# Altium PCB TYPEC_4KTransmitter-v1.0.PcbDoc (part 9 of 12)
Units mil, origin at the board's own origin, x right, y up, seen from the top; angles counter-clockwise.
Board outline 2834.7 x 1259.84 mil, 10 copper layers (Top Layer, GND-1, Signal L1, GND-2, PWR-1, PWR-2, GND-3, Signal L2, GND-4, Bottom Layer), stack 61.686 mil thick; 475 components, 338 nets, 2161 pads, 1240 vias.
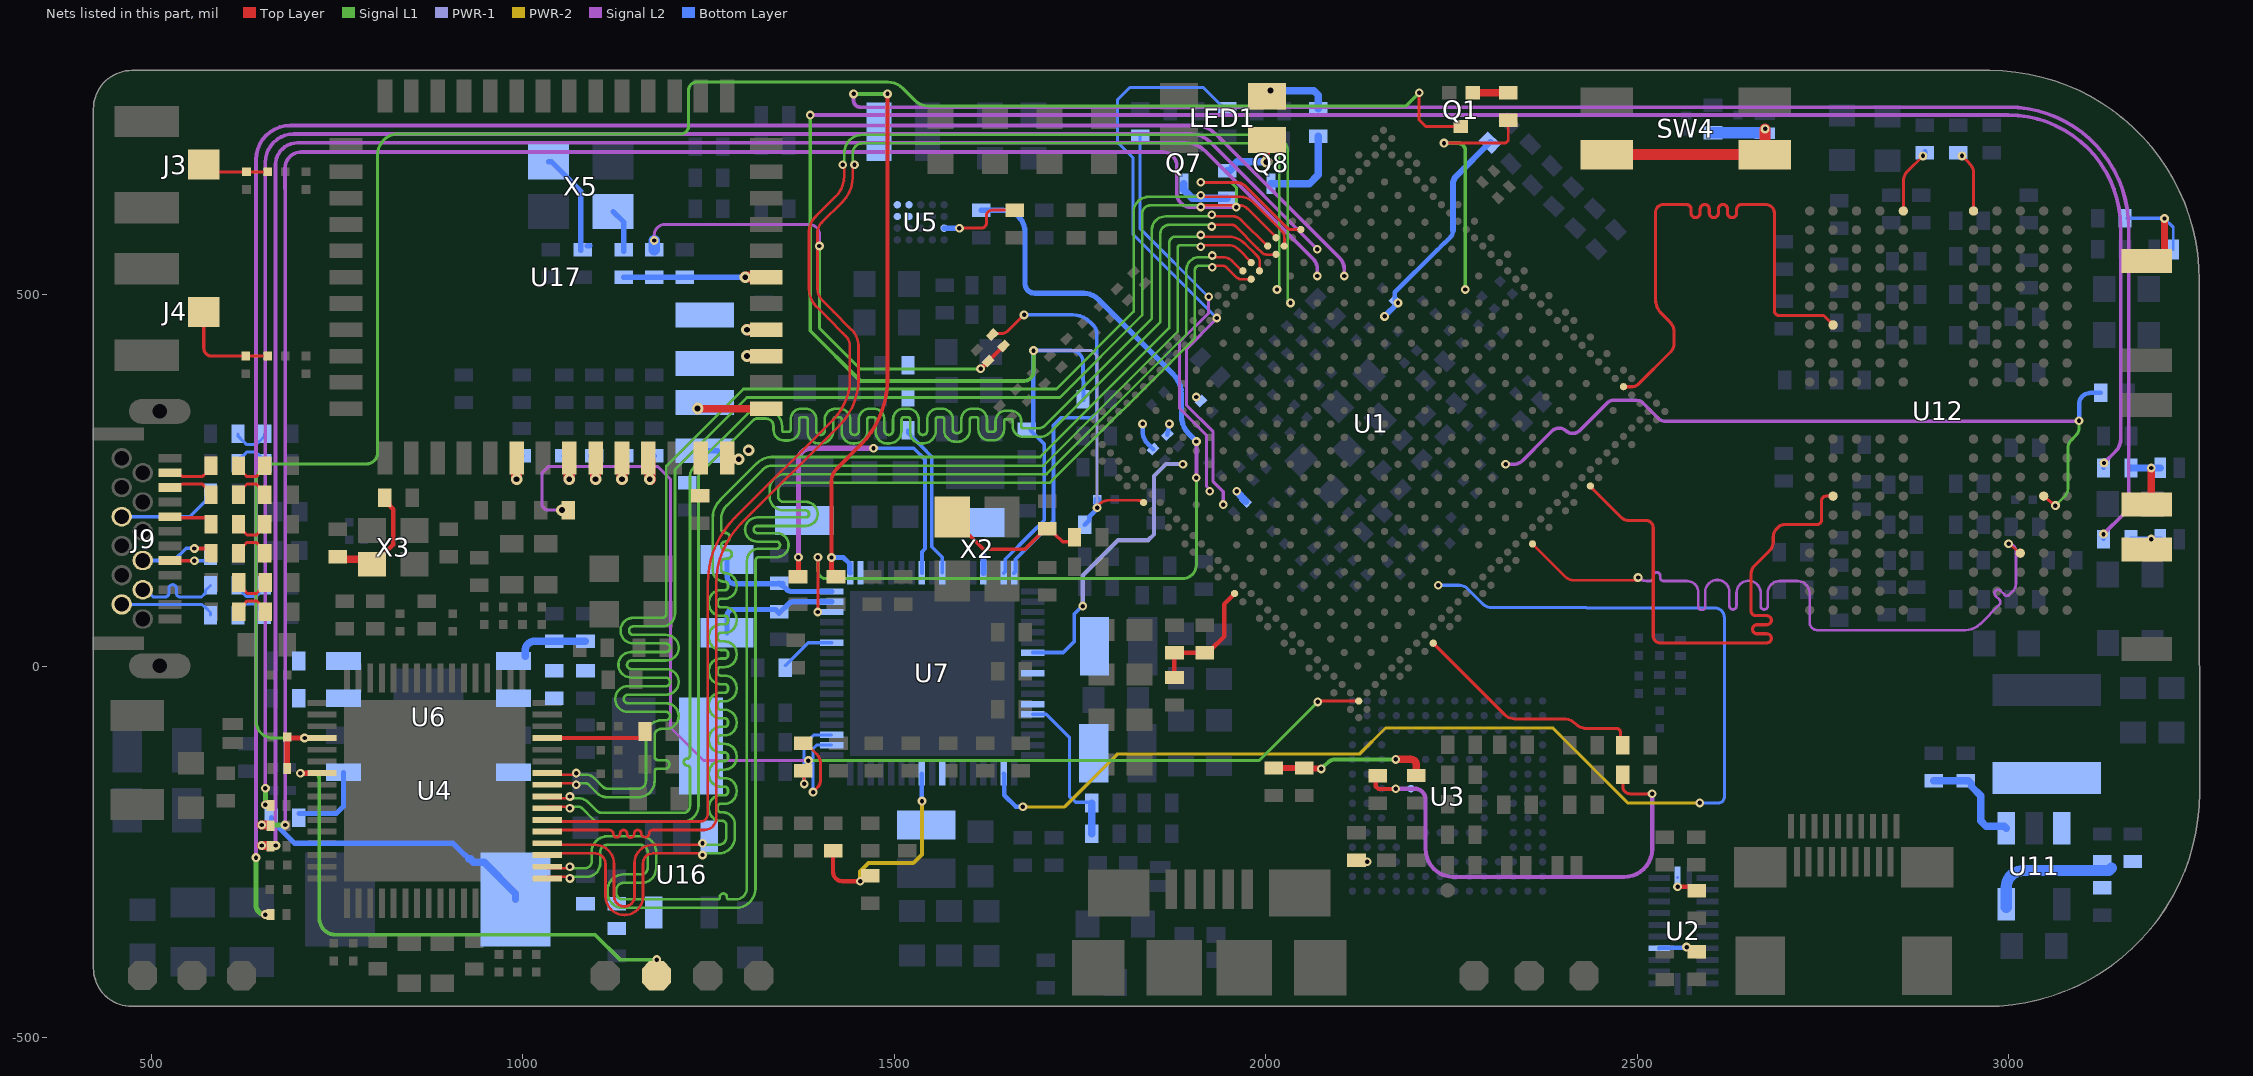
[diagram p15: the nets of this part, all layers, seen from the top]

## Via types
v1: diameter 11.81, hole 5.91, Top Layer to Bottom Layer, tented both sides, 710 vias
v2: diameter 15.75, hole 7.87, Top Layer to Bottom Layer, tented both sides, 265 vias
v3: diameter 11.81, hole 5.91, Top Layer to Signal L1, tented both sides, 146 vias
v4: diameter 11.81, hole 5.91, Signal L2 to Bottom Layer, 60 vias
v5: diameter 11.81, hole 5.91, Signal L1 to Signal L2, 38 vias
v6: diameter 11.81, hole 5.91, Top Layer to Signal L1, 16 vias
v7: diameter 11.81, hole 5.91, Top Layer to Bottom Layer, 4 vias
v8: diameter 11.81, hole 5.91, Signal L1 to Signal L2, tented both sides, 1 vias

## Nets (pads, with @x,y where several pads share a name; then routed paths per layer and width w, separated by ;. In a path a pad name is that pad's centre, name@x,y a point inside that pad or via, vN(x,y) a via of type N, cw(c..) or ccw(c..) an arc to the next point about the centre after c; other vN are vias at no path point) (continued)
LPDDR4_DQS1_B_P: U1.A17 U12.W10 | length 1057.4
  Top Layer w3.5: U1.A17@2359.19,164.36 2403.55,120 ccw(c2414.15,130.61) 2414.15,115.61 2497.86,115.61 ccw(c2497.86,119.11) v1(2501.36,119.11) ; v1(3000.07,164.69) U12.W10@3015.82,151.9
  Signal L2 w3.5: v1(2501.36,119.11) ccw(c2512.7,130.45) 2506.18,115.8 ccw(c2512.7,130.45) 2512.7,114.41 2516.91,114.41 ccw(c2516.91,119.16) 2521.66,119.16 2521.66,121.19 cw(c2526.41,121.19) 2531.16,121.19 2531.16,119.16 ccw(c2535.91,119.16) 2535.91,114.41 2567.19,114.41 cw(c2567.19,99.31) 2582.17,101.26 2582.29,97.78 2582.29,80.55 ; 2582.29,80.52 2582.29,80.27 ccw(c2587.04,80.27) 2591.79,80.27 2591.79,99.53 cw(c2608.04,99.53) 2624.29,99.53 2624.29,80.77 ccw(c2629.04,80.77) 2633.79,80.77 2633.79,98.4 cw(c2650.04,98.4) 2666.29,98.4 2666.29,80.77 ccw(c2671.04,80.77) 2675.79,80.77 2675.79,98.16 cw(c2692.04,98.16) 2692.04,114.41 2715.64,114.41 cw(c2715.64,97.85) 2732.2,97.85 2732.2,58.53 ccw(c2742.44,58.61) 2741.93,48.38 ccw(c2742.08,51.88) 2742.06,48.38 2748.37,48.38 2941.97,48.38 ccw(c2941.9,76.45) 2961.61,56.46 2961.95,56.8 ; 2961.97,56.82 2987.72,82.57 ccw(c2984.35,85.92) 2987.71,89.28 2982.56,94.43 cw(c2986.18,98) 2982.58,101.59 cw(c2985.71,98.46) 2988.83,101.6 2994.43,96 ccw(c2997.79,99.36) 3001.14,96 3005.81,100.66 3006.33,101.22 ccw(c2995.52,110.95) 3007.43,102.59 ccw(c2995.52,110.95) 3010.07,110.95 3010.07,154.69 ccw(c3000.07,154.69) v1(3000.07,164.69)
LPDDR4_ODT0_CA_A: U1.E2 U12.G2 | length 745.5
  Top Layer w4.2: U1.E2@2481.68,375.93 2493.52,375.93 ccw(c2493.52,387.38) 2501.61,379.28 ; 2501.61,379.29 2545.06,422.73 ccw(c2533.47,434.31) 2549.86,434.31 2549.86,448.58 ccw(c2528.25,448.58) 2543.53,463.86 2532.49,474.9 cw(c2550.91,493.32) 2524.86,493.32 2524.86,610.71 cw(c2535.28,610.71) 2535.28,621.13 2566.43,621.13 cw(c2566.43,614.98) 2569.94,620.03 cw(c2566.43,614.98) 2572.58,614.98 2572.58,609.69 ccw(c2578.73,609.69) 2584.88,609.69 2584.88,614.98 cw(c2591.03,614.98) 2597.18,614.98 2597.18,609.69 ccw(c2603.33,609.69) 2609.48,609.69 2609.48,614.98 cw(c2615.63,614.98) 2621.78,614.98 2621.78,609.69 ccw(c2627.93,609.69) 2634.08,609.69 2634.08,614.98 cw(c2640.23,614.98) 2640.23,621.13 2673.17,621.13 cw(c2673.17,609.44) 2684.86,609.44 2684.86,478.17 ccw(c2691.33,478.17) 2691.33,471.69 2751.14,471.69 U12.G2@2763.85,458.99
LPDDR4_ODT0_CA_B: U1.A10 U12.T2 | length 760
  Top Layer w4.2: U1.A10@2437.14,242.31 2437.14,241.55 2478.35,200.33 ccw(c2488.96,210.94) 2488.96,195.94 2511.88,195.94 cw(c2511.88,186.12) 2521.7,186.12 2521.7,40.46 ccw(c2531.03,40.46) 2531.03,31.13 2674.69,31.13 ccw(c2674.69,36.97) 2678.82,32.84 ; 2674.61,31.15 ccw(c2674.61,37.25) 2674.61,43.35 2661.47,43.35 cw(c2661.47,49.45) 2661.47,55.55 2674.61,55.55 ccw(c2674.61,61.65) 2674.61,67.75 2659.63,67.75 cw(c2659.63,73.85) 2653.53,73.85 2653.53,124.14 cw(c2669.04,124.14) 2658.1,135.13 2678.86,155.88 ; 2678.86,155.89 ccw(c2668.31,166.43) 2683.23,166.43 2683.23,174.11 cw(c2697.3,174.11) 2687.34,184.05 ; 2687.35,184.06 2690.64,187.36 cw(c2697.78,180.26) 2697.78,190.33 2741.87,190.33 ccw(c2741.87,196.87) 2748.41,196.87 2748.41,222.66 cw(c2754.41,222.66) 2754.41,228.66 U12.T2@2763.85,228.67
LPDDR4_RESETn: C238.2 U1.1C7 U12.T11 | length 1040.1
  Top Layer w4.1: U12.T11@3047.31,228.67 v1(3063.06,215.87)
  Signal L1 w4: v1(3063.06,215.87) 3075.47,228.28 ccw(c3064.86,238.88) 3079.86,238.88 3079.86,293.28 cw(c3094.86,293.28) 3084.24,303.88 3090.47,310.11 ccw(c3079.86,320.71) 3094.86,320.71 v1(3094.86,330.03)
  Signal L2 w4.7: v1(2322.99,271.54) 2333.77,271.54 ccw(c2333.77,288.93) 2346.05,276.62 ; 2346.06,276.63 2377.79,308.36 ; 2377.81,308.39 2386.01,316.56 cw(c2394.98,307.57) 2388.82,318.68 cw(c2394.98,307.57) 2401.78,318.3 cw(c2394.98,307.57) 2401.96,318.19 2404.51,316.51 ; 2417.68,313.84 cw(c2413.47,325.83) 2406.5,315.21 2404.51,316.51 ; 2422.18,316.34 cw(c2413.44,325.82) 2404.51,316.51 ; 2422.2,316.36 2459.88,354.03 cw(c2468.31,345.6) 2468.31,357.53 2498.64,357.53 cw(c2498.64,343.77) 2508.37,353.5 2528.28,333.59 ccw(c2538.57,343.88) 2528.35,333.52 ccw(c2538.57,343.88) 2538.57,329.33 v1@3094.86,329.33
  Bottom Layer w6: v1(3094.86,330.03) 3094.86,352.26 cw(c3109.86,352.26) 3099.25,362.86 3099.52,363.13 cw(c3110.13,352.53) 3110.13,367.53 C238.2@3123.86,367.53
MIPI_CSI_RX_CLK0_N: U1.1U9 U4.54 | length 2055.8
  Top Layer w3.5: U4.54@1033.07,-207.15 ccw(c1035.2,-207.15) 1035.2,-209.27 1239.49,-209.27 ccw(c1239.49,-199.63) 1249.13,-199.63 1249.13,111 cw(c1374.94,110.77) 1286.07,199.83 1418.2,331.95 ccw(c1364.2,385.96) 1440.57,386.1 ; 1385.42,507.82 ccw(c1418.94,507.72) 1395.25,484 ; 1385.42,507.86 1385.42,584.45 cw(c1400.42,584.38) 1385.43,584.9 cw(c1391.17,584.76) 1385.43,585.03 cw(c1415.57,583.53) 1393.17,603.75 cw(c1397.45,599.9) 1393.29,603.87 cw(c1404.25,593.64) 1393.59,604.19 1395.06,605.66 ; 1395.08,605.68 1421.69,632.29 ccw(c1394.54,659.49) 1432.97,659.49 1432.97,659.54 1432.97,674.73 v3(1430.82,674.73) ; 1395.28,483.97 1410.9,468.35 ; 1410.92,468.33 1431.45,447.8 ccw(c1439.59,455.93) 1431.49,447.76 1434.84,444.41 cw(c1421.11,430.62) 1440.57,430.62 1440.57,386.11
  Signal L1 w3.5: v3(1430.82,674.73) 1432.97,674.73 1432.97,690.67 cw(c1457.2,690.67) 1457.2,714.9 2006.54,714.9 cw(c2006.54,691.41) 2030.03,691.41 2030.03,488.68 v1(2033.47,488.68)
MIPI_CSI_RX_CLK0_P: U1.1V9 U4.53 | length 2055.9
  Top Layer w3.5: U4.53@1033.07,-222.9 cw(c1035.2,-222.9) 1035.2,-220.77 1116.85,-220.77 cw(c1116.85,-226.15) 1122.22,-226.15 ccw(c1126.66,-226.17) 1131.1,-226.17 1131.1,-225.52 cw(c1135.85,-225.52) 1140.6,-225.52 1140.6,-226.11 ccw(c1145.35,-226.11) 1150.1,-226.11 1150.1,-225.52 cw(c1154.85,-225.52) 1159.6,-225.52 ccw(c1164.38,-225.52) 1164.38,-230.3 1165.61,-230.3 ccw(c1165.61,-225.64) 1165.93,-230.29 ccw(c1165.61,-225.64) 1170.26,-225.65 cw(c1175.13,-225.65) 1175.13,-220.77 1244.25,-220.77 ccw(c1244.25,-204.4) 1260.63,-204.4 1260.63,110.98 cw(c1374.94,110.77) 1294.23,191.72 1426.33,323.82 ccw(c1364.2,385.96) 1452.07,386.13 1452.07,430.62 ccw(c1421.11,430.62) 1442.97,452.55 1439.59,455.93 1419.05,476.46 ; 1396.92,507.79 ccw(c1418.94,507.72) 1403.37,492.14 ; 1396.92,507.86 1396.92,584.4 cw(c1400.42,584.38) 1396.92,584.54 cw(c1415.57,583.53) 1401.67,596 ; 1401.67,596.01 cw(c1404.25,593.64) 1401.75,596.09 1403.19,597.53 ; 1403.21,597.55 1430.42,624.75 ccw(c1396.5,658.68) 1444.47,658.68 1444.47,658.73 1444.47,674.73 v3(1446.63,674.73) ; 1403.41,492.1 1419.02,476.5 ; 1419.05,476.46 ccw(c1410.92,468.33) 1419.02,476.5
  Signal L1 w3.5: v3(1446.63,674.73) 1444.47,674.73 1444.47,690.67 cw(c1457.2,690.67) 1457.2,703.4 2006.54,703.4 cw(c2006.54,691.41) 2018.53,691.41 2018.53,506.78 v1(2015.37,506.78)
MIPI_CSI_RX_D0_N: U1.AR18 U4.50 | length 2052.6
  Top Layer w3.5: U4.50@1033.07,-270.14 ccw(c1035.2,-270.14) 1035.2,-272.26 1061.44,-272.26 ccw(c1061.44,-270.11) v3(1063.6,-270.11) ; v3(1928.36,552.54) 1928.36,550.38 1942.35,550.38 1942.42,550.38 cw(c1942.41,532.62) 1954.97,545.18 1955.03,545.12 1968.32,531.83 U1.AR18@1969.44,531.83
  Signal L1 w3.5: v3(1063.6,-270.11) 1063.6,-272.26 1079.14,-272.26 1083.77,-272.26 ccw(c1083.77,-263.05) 1092.98,-263.05 1092.98,-250.07 cw(c1113.79,-250.07) 1113.79,-229.27 1158.81,-229.27 cw(c1158.81,-250.2) 1179.74,-250.2 1179.74,-272.13 cw(c1159.89,-272.13) 1159.89,-291.99 1135.57,-291.99 ccw(c1135.57,-301.47) 1126.09,-301.47 1126.09,-305.55 ccw(c1134.57,-305.55) 1134.57,-314.04 1262.9,-314.04 ccw(c1262.9,-311.5) 1265.44,-311.5 ; 1265.44,-311 cw(c1270.19,-311) 1274.94,-311 1274.94,-311.5 ccw(c1277.48,-311.5) 1277.48,-314.04 1286.98,-314.04 ccw(c1286.98,-299.11) 1301.91,-299.12 1301.91,-299.04 1301.91,141.7 cw(c1318.16,141.7) 1318.16,157.95 1341.7,157.95 ccw(c1341.7,162.7) 1341.7,167.45 1315.59,167.45 cw(c1315.63,183.7) 1315.64,199.95 1380.88,199.95 ccw(c1380.88,204.7) 1380.88,209.45 1351.05,209.45 cw(c1351.05,228.02) 1332.48,228.02 1332.48,237.19 cw(c1353.51,237.19) 1353.51,258.22 1705.07,258.22 1893.37,446.53 1893.37,532.96 cw(c1910.8,532.96) 1910.8,550.38 1928.36,550.38 v3(1928.36,552.54)
MIPI_CSI_RX_D0_P: U1.AP18 U4.49 | length 2052.8
  Top Layer w3.5: U4.49@1033.07,-285.89 cw(c1035.2,-285.89) 1035.2,-283.76 1061.44,-283.76 cw(c1061.44,-285.92) v3(1063.6,-285.92) ; v3@1930.14,538.88 1940.94,538.88 cw(c1940.94,529.06) 1947.88,536 1949.22,534.67 1960.71,523.18 1961.29,522.73 ccw(c1968.32,531.83) 1968.32,520.33 1971.88,520.33 1980.21,520.33 U1.AP18@1980.58,520.7
  Signal L1 w3.5: v3(1063.6,-285.92) 1063.6,-283.76 1086.11,-283.76 ccw(c1086.11,-265.39) 1104.48,-265.39 1104.48,-250.13 cw(c1113.96,-250.25) 1113.96,-240.77 1158.81,-240.77 cw(c1158.81,-250.2) 1168.24,-250.2 1168.24,-272.13 cw(c1159.89,-272.13) 1159.89,-280.49 1135.57,-280.49 ccw(c1135.57,-301.47) 1114.59,-301.47 1114.59,-305.55 ccw(c1134.57,-305.55) 1134.57,-325.54 1286.98,-325.54 ccw(c1286.98,-299.11) 1313.41,-299.13 1313.41,-299.06 ; 1313.41,-299.04 1313.41,141.7 cw(c1318.16,141.7) 1318.16,146.45 1341.7,146.45 ccw(c1341.7,162.7) 1341.7,178.95 1315.62,178.95 cw(c1315.63,183.7) 1315.63,188.45 1380.88,188.45 ccw(c1380.88,204.7) 1380.88,220.95 1351.19,220.95 cw(c1351.19,228.17) 1343.98,228.17 1343.98,237.19 cw(c1353.51,237.19) 1353.51,246.72 1709.83,246.72 1904.87,441.76 1904.87,532.95 cw(c1910.8,532.95) 1910.8,538.88 1928.36,538.88 v3(1928.36,536.73)
MIPI_CSI_RX_D1_N: U1.AP17 U4.52 | length 2055.9
  Top Layer w3.5: U4.52@1033.07,-238.65 ccw(c1035.19,-238.65) 1035.19,-240.77 1097.45,-240.77 cw(c1097.45,-266.36) 1123.04,-266.36 1123.04,-309.55 ccw(c1137.14,-309.55) 1137.14,-323.65 ccw(c1137.14,-310.26) 1150.53,-310.26 1150.53,-298.42 ; 1150.53,-298.36 1150.53,-265.37 cw(c1175.13,-265.37) 1175.13,-240.77 1239.95,-240.77 ccw(c1239.95,-238.61) v3(1242.1,-238.61) ; v3(1912.78,580.13) 1912.78,577.98 1949.25,577.98 cw(c1949.25,545.24) 1972.4,568.39 1972.44,568.34 1986.46,554.32 1988.3,552.49 1988.73,552.05 cw(c1980.58,543.94) 1992.08,543.94 1992.08,542.97 1992.08,538.88 1992.08,532.2 U1.AP17@1991.71,531.83
  Signal L1 w3.5: v3(1242.1,-238.61) ccw(c1244.26,-238.61) 1244.26,-240.77 1263.9,-240.77 ccw(c1263.9,-230.5) 1274.17,-230.54 ; 1271.85,113.59 cw(c1271.85,129.69) 1255.75,129.69 1255.75,198.35 cw(c1291.62,198.42) 1266.28,223.81 1315.4,272.93 cw(c1335.47,252.91) 1334.68,281.24 cw(c1335.47,252.91) 1335.56,281.26 1381.73,281.26 1696.64,281.26 1870.27,454.88 1870.27,568.98 cw(c1879.27,568.98) 1879.27,577.98 1912.78,577.98 v3(1912.78,580.13) ; 1271.87,113.59 cw(c1271.87,108.99) 1276.47,108.99 1276.47,106.69 cw(c1271.87,106.69) 1271.87,102.09 1266.85,102.09 ccw(c1266.85,85.99) 1250.75,85.99 1250.75,83.69 ccw(c1266.85,83.69) 1266.85,67.59 1271.87,67.59 cw(c1271.87,62.99) 1276.47,62.99 1276.47,60.69 cw(c1271.87,60.69) 1271.87,56.09 1266.85,56.09 ccw(c1266.85,39.99) 1250.75,39.99 1250.75,37.69 ccw(c1266.85,37.69) 1266.85,21.59 1271.87,21.59 cw(c1271.87,16.99) 1276.47,16.99 1276.47,14.69 cw(c1271.87,14.69) 1271.87,10.09 1266.85,10.09 ccw(c1266.85,-6.01) 1250.75,-6.01 1250.75,-8.31 ccw(c1266.85,-8.31) 1266.85,-24.41 1271.87,-24.41 cw(c1271.87,-29.01) 1276.47,-29.01 1276.47,-31.31 cw(c1271.87,-31.31) 1271.87,-35.91 1266.85,-35.91 ccw(c1266.85,-52.01) 1250.75,-52.01 1250.75,-54.31 ccw(c1266.85,-54.31) 1266.85,-70.41 1271.87,-70.41 cw(c1271.87,-75.01) 1276.47,-75.01 1276.47,-77.31 cw(c1271.87,-77.31) 1271.87,-81.91 1266.85,-81.91 ccw(c1266.85,-98.01) 1250.75,-98.01 1250.75,-100.31 ccw(c1266.85,-100.31) 1266.85,-116.41 1271.87,-116.41 cw(c1271.87,-121.01) 1276.47,-121.01 1276.47,-123.31 cw(c1271.87,-123.31) 1271.87,-127.91 1266.85,-127.91 ccw(c1266.85,-144.01) 1250.75,-144.01 1250.75,-146.31 ccw(c1266.85,-146.31) 1266.85,-162.41 1271.87,-162.41 cw(c1271.87,-167.01) 1276.47,-167.01 1276.47,-169.31 cw(c1271.87,-169.31) 1271.87,-173.91 1266.85,-173.91 ccw(c1266.85,-190.01) 1250.75,-190.01 1250.75,-192.31 ccw(c1266.85,-192.31) 1264.44,-208.23 ccw(c1266.85,-192.31) 1266.85,-208.41 1268.56,-208.41 cw(c1268.56,-213.97) 1274.12,-213.97 1274.12,-220.44 ; 1274.15,-230.52 1274.15,-220.46
MIPI_CSI_RX_D1_P: U1.AR17 U4.51 | length 2056
  Top Layer w3.5: U4.51@1033.07,-254.39 cw(c1035.19,-254.39) 1035.19,-252.27 1097.45,-252.27 cw(c1097.45,-266.36) 1111.54,-266.36 1111.54,-309.55 ccw(c1137.14,-309.55) 1137.14,-335.15 ccw(c1137.14,-310.26) 1162.03,-310.26 1162.03,-265.37 cw(c1175.13,-265.37) 1175.13,-252.27 1239.95,-252.27 cw(c1239.95,-254.42) v3(1242.1,-254.42) ; v3(1912.78,564.32) 1912.78,566.48 1948.82,566.48 cw(c1948.82,544.2) 1964.57,559.95 1980.58,543.94 U1.AR17@1980.58,542.97
  Signal L1 w3.5: v3(1242.1,-254.42) cw(c1244.26,-254.42) 1244.26,-252.27 1263.9,-252.27 ccw(c1263.9,-230.5) 1285.67,-230.54 1285.67,-225.78 ; 1267.25,198.35 1267.25,184.83 ccw(c1273,184.83) 1273,179.08 cw(c1273.01,173.33) 1273.01,167.58 ccw(c1273,161.83) 1273,156.08 1275.84,156.08 cw(c1275.84,150.33) 1275.84,144.58 1273,144.58 ccw(c1273,138.83) 1267.25,138.83 1267.25,129.7 ccw(c1271.87,129.7) 1271.87,125.09 cw(c1271.87,108.99) 1287.97,108.99 1287.97,106.69 cw(c1271.87,106.69) 1271.87,90.59 1266.85,90.59 ccw(c1266.85,85.99) 1262.25,85.99 1262.25,83.69 ccw(c1266.85,83.69) 1266.85,79.09 1271.87,79.09 cw(c1271.87,62.99) 1287.97,62.99 1287.97,60.69 cw(c1271.87,60.69) 1271.87,44.59 1266.85,44.59 ccw(c1266.85,39.99) 1262.25,39.99 1262.25,37.69 ccw(c1266.85,37.69) 1266.85,33.09 1271.87,33.09 cw(c1271.87,16.99) 1287.97,16.99 1287.97,14.69 cw(c1271.87,14.69) 1271.87,-1.41 1266.85,-1.41 ccw(c1266.85,-6.01) 1262.25,-6.01 1262.25,-8.31 ccw(c1266.85,-8.31) 1266.85,-12.91 1271.87,-12.91 cw(c1271.87,-29.01) 1287.97,-29.01 1287.97,-31.31 cw(c1271.87,-31.31) 1271.87,-47.41 1266.85,-47.41 ccw(c1266.85,-52.01) 1262.25,-52.01 1262.25,-54.31 ccw(c1266.85,-54.31) 1266.85,-58.91 1271.87,-58.91 cw(c1271.87,-75.01) 1287.97,-75.01 1287.97,-77.31 cw(c1271.87,-77.31) 1271.87,-93.41 1266.85,-93.41 ccw(c1266.85,-98.01) 1262.25,-98.01 1262.25,-100.31 ccw(c1266.85,-100.31) 1266.85,-104.91 1271.87,-104.91 cw(c1271.87,-121.01) 1287.97,-121.01 1287.97,-123.31 cw(c1271.87,-123.31) 1271.87,-139.41 1266.85,-139.41 ccw(c1266.85,-144.01) 1262.25,-144.01 1262.25,-146.31 ccw(c1266.85,-146.31) 1266.85,-150.91 1271.87,-150.91 cw(c1271.87,-167.01) 1287.97,-167.01 1287.97,-169.31 cw(c1271.87,-169.31) 1271.87,-185.41 1266.85,-185.41 ccw(c1266.85,-190.01) 1262.25,-190.01 1262.25,-192.31 ccw(c1266.85,-192.31) 1266.85,-196.91 1269.1,-196.91 cw(c1269.1,-213.44) 1285.62,-213.44 1285.65,-225.76 ; 1267.25,198.39 cw(c1291.62,198.42) 1274.38,215.64 ; 1274.41,215.67 1323.46,264.72 cw(c1335.59,252.62) 1335.59,269.76 1701.41,269.76 1881.77,450.12 1881.77,562.87 cw(c1885.37,562.87) 1885.37,566.48 1911,566.48 v3@1912.02,565.45 ; v3@1912.02,565.45 1912.78,564.7 v3(1912.78,564.32)
MIPI_CSI_RX_D2_N: U1.AR15 U4.56 | length 2055.7
  Top Layer w3.5: U4.56@1033.07,-175.65 ccw(c1035.2,-175.65) 1035.2,-177.77 1061.44,-177.77 ccw(c1061.44,-175.62) v3(1063.6,-175.62) ; v3(1927.46,607.32) 1927.46,605.17 1956.05,605.17 cw(c1956.05,589.62) 1967.04,600.62 1967.09,600.57 U1.AR15@2002.42,565.24
  Signal L1 w3.5: v3(1063.6,-175.62) 1063.6,-177.77 1074.83,-177.77 1074.89,-177.77 cw(c1074.89,-196.28) 1087.98,-183.2 1088.04,-183.26 1099.19,-194.41 ccw(c1107.32,-186.27) 1107.32,-197.77 1215.64,-197.77 ccw(c1215.64,-188.16) 1225.25,-188.16 1225.25,-137.81 ccw(c1221.49,-137.81) 1221.49,-134.05 cw(c1221.49,-129.3) 1221.49,-124.55 ccw(c1221.49,-120.79) 1225.25,-120.79 1225.25,255.66 cw(c1240.25,255.66) 1229.61,266.24 1302.59,339.21 ; 1302.61,339.23 cw(c1315.63,326.32) 1315.63,344.66 1327.25,344.66 cw(c1327.26,329.66) 1327.34,344.66 cw(c1327.33,338.91) 1327.4,344.66 cw(c1327.13,322.61) 1349.18,322.61 1349.18,317.93 ccw(c1352.06,317.93) 1352.06,315.06 1357.81,315.06 ccw(c1357.81,317.93) 1360.68,317.93 1360.68,331.85 cw(c1375.06,331.85) 1375.06,346.22 1380.81,346.22 cw(c1380.81,331.85) 1395.18,331.85 1395.18,316.71 ccw(c1400.94,316.71) 1400.93,310.95 ccw(c1400.92,316.71) 1406.68,316.71 1406.68,331.85 cw(c1421.06,331.85) 1420.88,346.22 ; 1421.06,346.22 ccw(c1421.06,331.85) 1420.88,346.22 ; 1579,332.17 cw(c1567.5,331.94) 1579,332.1 cw(c1564.01,331.81) 1579.01,331.81 1579.01,318.2 ccw(c1583.72,318.2) 1583.72,313.48 1585.76,313.48 ccw(c1585.76,318.23) 1590.51,318.23 1590.51,331.85 cw(c1604.88,331.85) 1604.88,346.22 1610.63,346.22 cw(c1610.63,331.85) 1625.01,331.85 1625.01,318.13 ccw(c1627.88,318.13) 1627.88,315.26 1633.63,315.26 ccw(c1633.63,318.13) 1636.51,318.13 1636.51,329.43 cw(c1650.88,329.43) 1650.88,343.8 1656.63,343.8 cw(c1656.63,329.43) 1671.01,329.43 1671.01,322.86 ccw(c1673.88,322.86) 1673.88,319.99 1693.2,319.99 1694.61,319.99 ccw(c1694.61,331.27) 1702.59,323.29 1846.88,467.58 1846.88,586.69 cw(c1865.36,586.69) 1865.36,605.17 1927.46,605.17 v3(1927.46,607.32) ; 1579,332.22 ccw(c1564.63,331.85) 1579,332.32 ccw(c1564.63,331.85) 1564.63,346.22 1558.88,346.22 ccw(c1558.88,331.85) 1544.51,331.85 1544.51,316.71 cw(c1538.75,316.71) 1538.76,310.95 cw(c1538.77,316.71) 1533.01,316.71 1533.01,331.85 ccw(c1518.63,331.85) 1518.63,346.22 1512.88,346.22 ccw(c1512.88,331.85) 1498.51,331.85 1498.51,316.71 cw(c1492.75,316.71) 1492.76,310.95 cw(c1492.77,316.71) 1487.01,316.71 1487.01,331.85 ccw(c1472.63,331.85) 1472.63,346.22 1466.88,346.22 ccw(c1466.88,331.85) 1452.51,331.85 1452.51,316.71 cw(c1446.75,316.71) 1446.76,310.95 cw(c1446.77,316.71) 1441.01,316.71 1441.01,331.85 ccw(c1426.63,331.85) 1426.63,346.22 1420.88,346.22
MIPI_CSI_RX_D2_P: U1.AP15 U4.55 | length 2055.8
  Top Layer w3.5: U4.55@1033.07,-191.4 cw(c1035.2,-191.4) 1035.2,-189.27 1061.44,-189.27 cw(c1061.44,-191.43) v3(1063.6,-191.43) ; v3@1929.24,593.67 1955.48,593.67 cw(c1955.48,588.26) 1959.31,592.09 1989.33,562.07 1994.29,557.11 ccw(c2002.42,565.24) 2000.06,553.98 2001.21,553.74 2013.62,553.74 U1.AP15@2013.99,554.1
  Signal L1 w3.5: v3(1063.6,-191.43) 1063.6,-191.06 1065.38,-189.27 1074.85,-189.27 cw(c1074.85,-196.38) 1079.87,-191.36 1094.78,-206.26 ccw(c1102.05,-198.99) 1102.05,-209.27 1215.64,-209.27 ccw(c1215.64,-188.16) 1236.75,-188.16 1236.75,255.66 cw(c1240.25,255.66) 1237.76,258.12 1310.62,330.98 cw(c1315.88,325.72) 1315.88,333.16 1327.25,333.16 ; 1327.29,333.16 cw(c1327.13,322.61) 1337.68,322.61 1337.68,317.9 ccw(c1352.06,317.93) 1352.06,303.56 1357.81,303.56 ccw(c1357.81,317.93) 1372.18,317.93 1372.18,331.85 cw(c1375.06,331.85) 1375.06,334.72 1380.81,334.72 cw(c1380.81,331.85) 1383.68,331.85 1383.68,314.45 ccw(c1398.68,314.45) 1398.68,299.45 1400.92,299.45 ccw(c1400.92,316.71) 1418.18,316.71 1418.18,331.85 cw(c1421.06,331.85) 1420.98,334.72 1426.63,334.72 cw(c1426.63,331.85) 1429.51,331.85 1429.51,331.29 ccw(c1444.51,331.29) 1429.53,330.52 1429.67,327.76 cw(c1418.18,327.16) 1429.68,327.16 1429.68,314.45 ccw(c1444.68,314.45) 1444.68,299.45 1446.75,299.45 ccw(c1446.75,316.71) 1464.01,316.71 1464.01,331.85 cw(c1466.88,331.85) 1466.88,334.72 1472.63,334.72 cw(c1472.63,331.85) 1475.51,331.85 1475.51,314.45 ccw(c1490.51,314.45) 1490.51,299.45 1492.75,299.45 ccw(c1492.75,316.71) 1510.01,316.71 1510.01,331.85 cw(c1512.88,331.85) 1512.88,334.72 1518.63,334.72 cw(c1518.63,331.85) 1521.51,331.85 1521.51,314.45 ccw(c1536.51,314.45) 1536.51,299.45 1538.75,299.45 ccw(c1538.75,316.71) 1556.01,316.71 1556.01,331.85 cw(c1558.88,331.85) 1558.88,334.72 1564.63,334.72 cw(c1564.63,331.85) 1567.5,331.94 cw(c1564.01,331.81) 1567.51,331.81 1567.51,316.98 ccw(c1582.51,316.98) 1582.51,301.98 1585.76,301.98 ccw(c1585.76,318.23) 1602.01,318.23 1602.01,331.85 cw(c1604.88,331.85) 1604.88,334.72 1610.63,334.72 cw(c1610.63,331.85) 1613.51,331.85 1613.51,318.13 ccw(c1627.88,318.13) 1627.88,303.76 1633.63,303.76 ccw(c1633.63,318.13) 1648.01,318.13 1648.01,329.43 cw(c1650.88,329.43) 1650.88,332.3 1656.63,332.3 cw(c1656.63,329.43) 1659.51,329.43 1659.51,322.86 ccw(c1673.88,322.86) 1673.88,308.49 1696.22,308.49 ccw(c1696.3,327.2) 1709.55,313.98 1858.38,462.82 1858.38,581.92 cw(c1870.13,581.92) 1870.13,593.67 1927.46,593.67 v3(1927.46,591.51)
MIPI_CSI_RX_D3_N: U1.AP14 U4.58 | length 2055.9
  Top Layer w3.5: U4.58@1033.07,-144.16 ccw(c1035.2,-144.16) 1035.2,-146.28 1069.95,-146.28 ccw(c1069.95,-144.13) v3(1072.1,-144.13) ; v3(1912.78,633.64) 1912.78,631.48 1966.36,631.48 1966.42,631.48 cw(c1966.41,608.28) 1982.82,624.68 1982.89,624.62 2018.53,588.97 2019.68,587.83 2022.14,585.37 cw(c2013.99,577.26) 2025.21,579.75 cw(c2021.79,579.01) 2025.29,579.14 2025.49,573.81 2025.49,565.6 U1.AP14@2025.12,565.24
  Signal L1 w3.5: v3(1072.1,-144.13) 1072.1,-146.28 1085.08,-146.28 1085.15,-146.28 cw(c1085.13,-162.49) 1096.59,-151.03 1096.64,-151.08 1108.33,-162.77 ccw(c1113.96,-157.14) 1113.96,-165.1 1155.8,-165.1 ccw(c1155.8,-154.79) 1166.11,-154.79 1166.11,-93.66 cw(c1186.63,-93.66) 1186.63,-73.14 1192.81,-73.14 ccw(c1192.81,-67.39) 1192.81,-61.64 1141.86,-61.64 cw(c1141.86,-44.39) 1141.86,-27.14 1192.81,-27.14 ccw(c1192.81,-21.39) 1192.81,-15.64 1146.17,-15.64 cw(c1146.17,1.61) 1146.17,18.86 1192.81,18.86 ccw(c1192.81,24.61) 1192.81,30.36 1149.04,30.36 cw(c1149.04,47.61) 1149.04,64.86 1187.81,64.86 ccw(c1187.81,70.61) 1193.56,70.61 1193.56,269.28 1297.11,372.84 1718.29,372.84 1822.5,477.04 1822.5,611.2 cw(c1842.78,611.2) 1842.78,631.48 1912.78,631.48 v3(1912.78,633.64)
MIPI_CSI_RX_D3_P: U1.AR14 U4.57 | length 2055.8
  Top Layer w3.5: U4.57@1033.07,-159.91 cw(c1035.2,-159.91) 1035.2,-157.78 1069.95,-157.78 cw(c1069.95,-159.94) v3(1072.1,-159.94) ; v3(1912.78,617.82) 1912.78,619.98 1965.16,619.98 cw(c1965.16,605.26) 1975.57,615.67 2013.99,577.26 U1.AR14@2013.99,576.37
  Signal L1 w3.5: v3(1072.1,-159.94) 1072.1,-159.57 1073.88,-157.78 1083.65,-157.78 cw(c1083.65,-166.06) 1089.48,-160.18 1091.15,-161.85 1100.3,-171 ccw(c1113.74,-157.67) 1113.74,-176.6 1113.79,-176.6 1155.8,-176.6 ccw(c1155.8,-154.79) 1176.94,-160.15 ccw(c1155.8,-154.79) 1177.3,-158.4 ccw(c1155.8,-154.79) 1177.61,-154.79 1177.61,-141.77 cw(c1181.11,-141.79) 1180.79,-138.31 cw(c1181.49,-146.28) 1181.49,-138.28 1191.95,-138.28 ccw(c1191.95,-132.53) 1192.03,-126.78 1182.86,-126.78 cw(c1182.86,-121.53) 1177.61,-121.53 1177.61,-93.66 cw(c1186.63,-93.66) 1186.63,-84.64 1192.81,-84.64 ccw(c1192.81,-67.39) 1192.81,-50.14 1141.86,-50.14 cw(c1141.86,-44.39) 1141.86,-38.64 1192.81,-38.64 ccw(c1192.81,-21.39) 1192.81,-4.14 1146.17,-4.14 cw(c1146.17,1.61) 1146.17,7.36 1192.81,7.36 ccw(c1192.81,24.61) 1192.81,41.86 1149.04,41.86 cw(c1149.04,47.61) 1149.04,53.36 1187.81,53.36 ccw(c1187.81,70.61) 1205.06,70.61 1205.06,264.52 1301.88,361.34 1723.06,361.34 1834,472.28 1834,608.96 cw(c1845.02,608.96) 1845.02,619.98 1912.78,619.98 v3(1912.78,617.82)
NetC5_2: C5.2 L1.1 U17.25 | length 35.5
  Bottom Layer w7: L1.1@1245.36,289.76 1262.18,289.76 L1.1@1275.41,276.53
  other v2: 1290.99,278.37 1304.17,290.41
NetC6_2: C6.2 C184.2 J3.1 | length 74.6
  Top Layer w4.2: J3.1@582.36,665.16 629.29,665.16 C6.2@656.98,665.16
NetC7_2: C7.2 C185.2 J4.1 | length 140.9
  Top Layer w4.2: J4.1@570.88,476.5 570.88,427.84 ccw(c581.59,427.84) 581.59,417.13 629.29,417.13 C7.2@656.98,417.13
NetC10_1: C10.1 U6.1 | length 109.3
  Bottom Layer w7: C10.1@699.05,-198.49 749.13,-198.49 758.85,-188.77 U6.1@758.85,-143.28
NetC10_2: C10.2 L12.1 U6.8 | length 381.3
  Bottom Layer w7: C10.2@661.81,-203.99 661.81,-207.49 692.93,-238.62 906.39,-238.62 922.56,-254.78 923.14,-254.78 927.37,-259.02 927.37,-259.6
  Bottom Layer w10: 927.37,-259.6 929.52,-259.6 934.03,-264.11 948.17,-264.11 990.42,-306.35 L12.1@990.42,-314.28
NetC11_1: C11.1 R4.2
NetC31_1: C31.1 U7.46 | length 75.1
  Bottom Layer w4.5: C31.1@1353.68,0.59 1384.47,31.37 U7.46@1416.03,31.37
NetC33_2: C33.2 C128.2 R37.1 R45.1 R109.2 U1.AG38 U7.67 | length 3695.3
  Top Layer w4: v1(1773.2,212.98) 1774.71,216.74 1775.32,217.35 cw(c1789.61,202.46) 1789.61,223.09 1828.43,223.09 cw(c1828.43,212.65) 1829.71,223.02 cw(c1828.43,212.65) 1834.5,221.15 cw(c1828.43,212.65) U1.AG38@1835.82,220.04
  Signal L1 w5: v5(1387.2,741.52) 1387.2,567.34 cw(c1382.2,567.34) 1387.17,566.76 ccw(c1399.49,565.32) 1387.16,563.9 cw(c1382.2,563.31) 1387.2,563.31 1387.2,451.25 1454.74,383.7 1674.93,383.7 ccw(c1674.93,396.31) 1687.54,396.31 v1@1687.54,426.56
  PWR-1 w4: v1(1687.55,424.58) 1765.83,424.52 1773.2,417.14 v1(1773.2,212.98)
  Signal L2 w5: v5(1387.2,741.52) 2999.52,741.52 cw(c2999.52,590.12) 3150.92,590.12 3150.92,305.21 cw(c3128,305.21) 3144.19,288.99 v4(3128.39,273.19)
  Bottom Layer w5: U7.67@1647.73,125.27 1649.56,127.1 1649.56,143.67 1685.75,179.87 1702.14,196.25 1702.14,298.72 1688.53,312.33 1688.42,312.33 1685.03,315.72 C33.2@1685.03,315.82 ; v1@1687.61,424.52 1738.57,424.52 cw(c1738.57,408.82) 1754.26,409.31 cw(c1738.57,408.82) 1754.27,408.82 1755.04,358.99 R109.2@1755.06,358.08 ; R37.1@3127.86,266.54 3127.86,272.66 v4(3128.39,273.19)
  Bottom Layer w6: C33.2@1683.78,317.07 1687.54,320.83 v1(1687.55,424.58) ; R45.1@1756.68,190.07 1762.68,196.07 1762.68,200.86 1772.09,210.27 1772.09,211.86 v1(1773.2,212.98)
  Bottom Layer w10: v1(1773.2,212.98) C128.2@1773.2,223.91
NetC34_2: C34.2 U7.50 X1.1 | length 176.5
  Bottom Layer w7: X1.1@1275.18,44.81 1275.29,61 1275.34,69.18 cw(c1282.77,68.38) 1282.77,75.85 1340.36,75.85 1345.18,71.03 1357.68,83.53 cw(c1364.83,76.38) 1364.83,86.49 U7.50@1416.03,86.49
NetC35_2: C35.2 U7.51 X1.2 | length 178.2
  Bottom Layer w7: X1.2@1275.18,142.74 1275.18,121 ccw(c1285.6,121) 1285.6,110.58 C35.2@1350.24,110.58 ; C35.2@1344.24,110.58 C35.2@1345.18,111.53 ; C35.2@1345.18,110.53 1353.66,105.03 ccw(c1362.32,110.53) 1362.32,100.27 U7.51@1416.03,100.27
NetC36_2: C36.2 R5.1 R8.2 U7.61 | length 210.8
  Bottom Layer w5: R8.2@1518.68,317.21 1518.68,313.71 1537.4,294.99 1550.68,281.71 1550.68,160.46 1564.81,146.34 U7.61@1564.81,125.51
NetC37_2: C37.2 R31.1 U7.52 | length 3011.1
  Top Layer w5: v1(1415.77,146.12) 1415.77,248.36 cw(c1440.48,248.36) 1422.96,265.79 1454.54,297.37 ccw(c1366.26,385.62) 1491.09,385.62 ; 1491.09,385.65 v3(1491.09,769.98)
  Top Layer w7: C37.2@1415.77,126.1 v1(1415.77,146.12) ; C37.2@1418.77,126.1 C37.2@1421.78,123.1
  Signal L1 w5: v5(1445.47,769.98) v3(1491.09,769.98)
  Signal L2 w5: v5(1445.47,769.98) 1445.47,761.03 ccw(c1454.29,761.03) 1454.29,752.21 2999.25,752.21 cw(c2999.25,589.74) 3161.72,589.74 3161.72,220.88 cw(c3138.94,220.88) 3155.03,204.76 v4(3127.79,177.51)
  Bottom Layer w5: v4(3127.79,177.51) 3127.86,177.44 R31.1@3127.86,170.79
  Bottom Layer w7: v1@1418.77,146.12 1431.6,146.12 1440.2,137.52 1440.2,126.1 U7.52@1441.03,125.27
NetC39_1: C39.1 U7.37 | length 114.1
  Top Layer w4.1: C39.1@1377.68,-140.76 1378.97,-142.04 v1(1378.97,-158.71)
  Bottom Layer w4.1: v1(1378.97,-158.71) 1378.74,-158.48 1378.74,-105.97 1392.07,-92.65 U7.37@1416.03,-92.65
NetC39_2: C39.2 U7.36 | length 164.1
  Top Layer w4.1: C39.2@1377.68,-103.76 1381.18,-103.76 1388.13,-110.71 1388.13,-110.93 1395.65,-118.45 ; v1@1392.35,-168.06 1396.78,-163.63 ccw(c1386.16,-153.03) 1401.16,-153.03 1401.16,-131.76 ccw(c1382.35,-131.76) 1395.67,-118.46
  Bottom Layer w4.1: v1(1390.97,-169.74) 1390.97,-153.8 1390.61,-153.44 1390.61,-111.68 1395.86,-106.43 U7.36@1416.03,-106.43
NetC52_2: C52.2 R171.2 | length 52
  Bottom Layer w4.1: C52.2@616.86,69.12 623.81,76.07 623.81,80.11 627.07,83.37 642.14,83.37 645.41,80.11 645.41,76.1 R171.2@652.36,69.15
NetC53_2: C53.2 R172.2 | length 52.6
  Bottom Layer w4.1: C53.2@616.86,108.49 623.81,101.54 623.81,97.5 627.83,93.48 641.38,93.48 645.41,97.5 645.41,101.5 R172.2@652.36,108.45
NetC54_2: C54.2 R175.2 | length 51.8
  Top Layer w4.1: C54.2@617.59,230.32 617.59,233.84 624.55,240.8 624.92,240.8 629.14,245.02 641.55,245.01 645.77,240.79 646.14,240.79 653.1,233.84 R175.2@653.09,230.3
NetC55_2: C55.2 R176.2 | length 51.8
  Top Layer w4.1: C55.2@617.59,269.63 617.59,266.09 624.54,259.13 624.91,259.13 629.14,254.91 641.54,254.91 ; 641.55,254.9 645.77,259.12 646.14,259.12 653.09,266.08 R176.2@653.09,269.6
NetC56_2: C56.2 R169.2 | length 51.8
  Top Layer w4.1: C56.2@617.86,112.42 617.85,108.87 624.81,101.92 625.18,101.92 629.4,97.69 641.8,97.69 646.03,101.91 646.4,101.91 653.36,108.87 R169.2@653.36,112.39
NetC57_2: C57.2 R170.2 | length 51.8
  Top Layer w4.1: C57.2@617.85,73.08 617.85,76.6 624.8,83.55 625.17,83.55 629.4,87.77 641.8,87.77 646.03,83.56 646.4,83.56 653.35,76.6 R170.2@653.35,73.08
NetC58_2: C58.2 R173.2 | length 51.8
  Bottom Layer w4.1: C58.2@617.17,273.28 617.17,276.8 624.13,283.76 624.5,283.76 628.72,287.98 641.12,287.98 645.35,283.77 645.72,283.77 652.68,276.81 R173.2@652.68,273.29
NetC59_2: C59.2 R174.2 | length 51.8
  Bottom Layer w4.1: C59.2@617.18,312.57 617.18,309.05 624.13,302.09 624.5,302.09 628.73,297.87 641.14,297.88 645.36,302.1 645.73,302.1 652.68,309.05 R174.2@652.68,312.57
NetC129_2: C129.2 R46.2 X2.1 | length 192
  Top Layer w4.7: X2.1@1579.35,198.14 1620.28,157.21 1676.21,157.21 C129.2@1697.01,178.01 ; C129.2@1698.78,183.53 C129.2@1702.28,183.53 ; C129.2@1706.28,184.53 1709.78,184.53 1716.43,177.88 1716.43,177.53 1726.98,166.99 1736.13,166.99 1740.78,171.64 R46.2@1740.78,173.03
NetC151_2: C151.2 R29.1 U1.1N5 U1.1N6 | length 291.2
  Bottom Layer w6: C151.2@2174.03,492.41 2173.88,492.56 2173.88,495.8 2174.03,495.95 2174.03,502.9 2231.16,560.03 2231.45,560.03 2240,568.58 cw(c2244.21,564.3) 2240.48,569 ccw(c2232.52,579.16) 2241.62,570.02 ccw(c2232.52,579.16) 2241.77,570.17 2245.42,573.89 2250.58,579.16 ccw(c2237.36,586.24) 2252.36,586.24
  Bottom Layer w8: v1(2160.14,470.59) v1(2178.23,488.68) ; 2252.36,586.24 2252.36,648.81 cw(c2267.36,648.81) 2256.75,659.42 R29.1@2302.81,705.48
NetC167_2: C167.2 L9.1 U17.29 | length 58
  Top Layer w7: v2@1299.67,452.69 1299.67,452.56 U17.29@1327.97,452.56
  Top Layer w15: v2(1301.96,452.56) U17.29@1330.26,452.56
  Bottom Layer w7: v2@1299.67,452.56 v2@1300.12,452.11 ; C167.2@1323.94,452.11 C167.2@1324.39,451.65
NetC203_2: C203.2 R99.1 U11.1 | length 146.3
  Bottom Layer w10: R99.1@2899.07,-154.63 C203.2@2942.59,-154.62 2946.09,-154.62 2950.09,-158.62 2950.09,-162.12 2962.36,-174.4 2962.36,-208.44 2969.63,-215.72 2994.28,-215.72 U11.1@2996.95,-218.39
NetC216_2: C216.2 D11.2 R39.2 SW4.1 SW4.3 | length 312.7
  Top Layer w15: SW4.1@2459.06,688.29 SW4.3@2671.66,688.29 ; SW4.3@2672.36,688.99 v1(2672.36,722.86)
  Bottom Layer w15: R39.2@2602.17,717.68 D11.2@2668.41,717.68
NetC251_1: C251.1 R28.2 R107.2 U3.K5 | length 232.8
  Top Layer w8: R28.2@2011.19,-137.34 2011.32,-137.48 2052.31,-137.48 2052.75,-137.91 2074.3,-137.91 v3(2074.86,-138.47)
  Top Layer w10: v1(2175.19,-125.74) 2195.64,-125.76 cw(c2195.64,-132.72) 2202.6,-132.72 R107.2@2202.6,-147.31
  Signal L1 w5.6: v3(2074.86,-138.47) 2074.86,-137.48 2085.64,-128.47 cw(c2093.16,-137.48) 2093.16,-125.74 v1@2172.2,-125.74
  Bottom Layer w4: v1(2175.19,-125.74) U3.K5@2195.64,-125.76
NetC252_2: C252.2 U3.C2
  other v1: 2136.59,-263.56
NetC254_1: C254.1 R100.1 R101.2 U11.5 | length 182.8
  Bottom Layer w15: U11.5@2996.95,-324.75 2996.95,-297.81 cw(c3019.35,-297.81) 3001.67,-284.05 cw(c3019.35,-297.81) 3005.6,-280.13 cw(c3019.35,-297.81) 3019.35,-275.41 3135.35,-275.41 3138.69,-272.07
NetC275_2: C275.2 R159.1 X3.3 | length 156.8
  Top Layer w6: X3.3@797.31,136.88 799.28,136.88 825.89,163.49 825.89,210.96 820.35,216.5 820.35,220.73 R159.1@814.35,226.73
  Top Layer w10: C275.2@751.07,143.89 790.3,143.89 X3.3@797.31,136.88
NetC288_1: C288.1 J9.A8 | length 60.5
  Top Layer w5: J9.A8@527.36,200.99 528.98,199.36 574.09,199.36 580.59,192.86 C288.1@580.59,190.49
  Top Layer w7: C288.1@580.59,190.49 C288.1@580.59,191.99
NetC288_2: C288.2 R114.2 | length 51.8
  Top Layer w4.1: C288.2@617.59,191.01 617.59,187.48 624.54,180.52 624.91,180.52 629.14,176.3 641.54,176.3 645.77,180.52 646.14,180.52 653.09,187.47 R114.2@653.09,190.99
NetC289_1: C289.1 J9.B8 | length 99
  Top Layer w5: v1(558.28,158.1) 575.31,158.1 C289.1@575.66,158.45 ; C289.1@575.66,155.45 C289.1@580.59,150.52
  Bottom Layer w5: J9.B8@490.73,141.93 530.88,141.93 547.4,158.45 557.93,158.45 v1(558.28,158.1)
NetC289_2: C289.2 R115.2 | length 51.8
  Top Layer w4.1: C289.2@617.59,151.7 617.59,155.2 624.54,162.16 624.91,162.16 629.14,166.38 641.54,166.38 645.77,162.17 646.14,162.17 653.09,155.21 R115.2@653.09,151.69
NetC292_1: C292.1 R113.1 R118.1 U16.5
NetD3_2: D3.2 R44.2 SW3.1 | length 278.2
  Top Layer w5: SW3.1@3158.89,545.39 3196.14,555.35 3209.87,559.03 SW3.1@3186.17,545.39 SW3.1@3158.89,545.39
  Top Layer w10: SW3.1@3186.17,545.39 3196.14,555.35 3208.7,555.35 3209.87,556.53 v1(3209.87,602.3)
  Bottom Layer w4: v1(3209.87,602.3) 3221.67,590.5 D3.2@3221.67,560.58
  Bottom Layer w5: R44.2@3159.81,602.53 3209.64,602.53 v1(3209.87,602.3)
NetJ9_A5: J9.A5 R116.2 | length 54.2
  Top Layer w5: J9.A5@527.36,141.93 527.51,141.77 v1@557.97,141.77
  Bottom Layer w5: v1(558.27,141.77) 575.09,141.77 R116.2@579.86,146.53
NetJ9_B5: J9.B5 R117.2 | length 133.1
  Bottom Layer w5: J9.B5@462.4,200.99 551.94,200.99 573.36,222.41 573.36,226.53 R117.2@579.86,233.03
NetL1_2: L1.2 U17.26 | length 92.6
  Top Layer w7: v2(1235.57,346.65) v2@1235.76,346.46 ; U17.26@1327.77,346.46 U17.26@1327.97,346.26
  Top Layer w10: v2@1235.76,346.46 U17.26@1327.77,346.46
NetL2_1: L2.1 U5.D3 U5.D4 U5.E3 U5.E4
NetL3_2: L3.2 U7.12
NetL4_2: L4.2 U7.9
NetL5_1: L5.1 U7.53
NetL6_2: L6.2 U7.65 | length 23.2
  Bottom Layer w8: U7.65@1620.17,125.27 1620.17,148.44
NetL7_2: L7.2 U7.25
NetL9_2: L9.2 U17.28 | length 56.7
  Top Layer w7: v2@1299.67,417.25 1299.67,417.13 U17.28@1327.97,417.13
  Top Layer w15: v2(1301.96,417.13) U17.28@1330.26,417.13
NetL10_1: L10.1 U11.3
NetL11_1: L11.1 U16.3
NetLED1_1: LED1.1 R47.1 | length 88.5
  Top Layer w10: v2@2001.71,679.01 2001.27,679.45 2001.27,707.56 LED1.1@2001.71,708
  Bottom Layer w10: R47.1@1948.16,666.71 1951.66,666.71 1955.66,670.71 1955.66,672.77 1961.52,678.63 v2@2001.22,678.63
  other v2: 2001.27,678.57
NetLED1_3: LED1.3 R85.1 | length 85.4
  Top Layer w10: LED1.3@2001.54,767.24 LED1.3@2001.72,767.06
  Bottom Layer w10: v2(2006.54,774.45) 2064.82,774.45 2070.68,768.59 2070.68,754.23 2071.08,753.83 R85.1@2071.08,750.23
NetQ1_1: Q1.1 R124.2 | length 48
  Top Layer w10: Q1.1@2278.64,771.52 2326.45,771.52 R124.2@2326.59,771.38
NetQ7_3: Q7.3 R47.2 | length 70.6
  Bottom Layer w10: Q7.3@1890.07,648.81 1890.07,640.93 1901.3,629.71 R47.2@1948.16,629.71
NetQ8_3: Q8.3 R85.2 | length 121.2
  Bottom Layer w10: Q8.3@2007.15,648.81 2058.81,648.81 2071.08,661.07 R85.2@2071.08,713.23
NetR2_2: R2.2 R95.2 R96.1 U17.31 | length 220.2
  Top Layer w7: v2@1299.67,523.3 1299.67,523.43 U17.31@1327.97,523.43
  Top Layer w15: v2@1299.67,523.43 U17.31@1327.97,523.43
  Bottom Layer w7: R96.1@1136.24,523.23 R2.2@1177.11,523.23 R95.2@1217.98,523.23 v2(1299.67,523.23)
NetR3_1: R3.1 U7.59 | length 494.1
  Top Layer w7: R3.1@1370.68,123.1 1371.18,123.6 v1(1371.18,146.47)
  Signal L2 w7: v1(1371.18,146.47) 1371.18,275.98 cw(c1388.31,275.98) 1388.31,293.12 v4(1472.27,293.12)
  Bottom Layer w5: v4(1472.27,293.12) 1526.55,293.12 1541.68,277.98 1541.68,157.75 1537.49,153.55 U7.59@1537.49,125.27
NetR4_1: R4.1 U6.6
NetR10_1: R10.1 U7.68 | length 555.2
  Top Layer w4: R10.1@1632.21,446.08 1636.9,446.08 1638.49,447.66 1644.77,447.66 ccw(c1644.77,459.58) 1653.2,451.15 v1@1674.71,472.66
  Bottom Layer w5: U7.68@1661.51,125.27 1663.34,127.1 1663.34,143.7 1714.66,195.02 1714.66,323.96 1724.67,333.97 1765.76,333.97 1772.66,340.87 1772.66,447.66 ccw(c1757.43,447.66) 1768.2,458.44 1763.49,463.15 ccw(c1740.51,440.17) 1740.53,472.66 1740.48,472.66 1675,472.66 v1(1674.96,472.62)
NetR11_2: R11.2 U6.4
NetR12_1: R12.1 U5.A2 | length 112.9
  Top Layer w4: v1@1588.06,589.32 1617.55,589.32 ccw(c1617.55,595.95) 1624.18,595.95 1624.18,606.04 cw(c1631.66,606.04) 1631.66,613.53 R12.1@1662.36,613.53
  Bottom Layer w7: U5.A2@1567.36,589.31 v1@1587.86,589.31
  other v1: 1587.86,589.11
NetR14_2: R14.2 U1.1V19 | length 38.7
  Bottom Layer w6: v1(1834.42,325.83) 1834.42,316 ccw(c1858.15,316) 1841.37,299.21 R14.2@1848.57,292.01
NetR15_2: R15.2 U1.1U18 | length 14.8
  Bottom Layer w6: R15.2@1867.74,311.41 1869.14,317.49 1870.61,325.81 v1(1870.52,325.83)
NetR20_2: R20.2 R23.2 U7.13 | length 216.6
  Bottom Layer w4.5: U7.13@1686.51,-65.09 1705,-65.09 1736.03,-96.12 1736.03,-175.14 1744.4,-183.51 1764.98,-183.51 R20.2@1765.89,-184.42
  Bottom Layer w10: R23.2@1765.89,-225.97 R20.2@1765.89,-184.42
NetR24_2: R24.2 R25.1 U7.27 | length 277.9
  Top Layer w5.6: R24.2@1417.97,-248.51 1417.97,-277.21 ccw(c1430.47,-277.21) 1430.47,-289.71 v1(1454.46,-289.71)
  PWR-2 w5.6: v1@1454.32,-286.85 1454.32,-276.58 1465.61,-265.29 1525.86,-265.29 1537.5,-253.65 v1(1537.5,-181.83)
  Bottom Layer w6: v1@1537.49,-176.02 U7.27@1537.49,-145.21
NetR27_1: R27.1 U4.61 | length 127.6
  Top Layer w6: U4.61@1033.07,-96.91 R27.1@1160.64,-96.91
NetR30_2: R30.2 U1.1M18 | length 18.1
  Bottom Layer w10: v1(1961.09,235.35) R30.2@1973.01,221.68
NetR32_2: R32.2 R33.1 U6.5 | length 96
  Bottom Layer w10: U6.5@1003.35,13.11 1003.35,20.52 cw(c1016.14,20.52) 1016.14,33.31 R33.1@1042.6,33.31 R32.2@1084.6,33.31
NetR34_2: R34.2 U1.1N19 | length 549.8
  Signal L2 w4.1: v4(1923.42,496.9) 1923.42,475.23 1884.22,436.04 1884.22,346.87 1920.39,310.71 1920.39,241.93 1924.89,237.43 v1(1924.89,235.34)
  Bottom Layer w4.1: R34.2@1831.36,713.23 1830.72,712.59 1830.72,589.13 v4@1923.18,496.67
NetR38_1: R38.1 U6.3
NetR41_2: R41.2 U1.1M19 | length 805
  Signal L2 w4.1: v4(1934.4,468.39) 1934.4,467.61 1893.3,426.5 1893.3,351.24 1929.42,315.12 1929.42,248.17 1942.99,234.6 v1(1942.99,217.25)
  Bottom Layer w4.1: v4@1935.06,467.73 v4(1934.4,468.39) 1821.25,581.54 1821.25,684.52 1800.52,705.25 1800.52,761.88 1817.28,778.64 1916.26,778.64 1944.66,750.23 R41.2@1948.16,750.23
NetR51_2: R51.2 U17.24
NetR53_2: R53.2 U1.A29 | length 318.2
  Top Layer w4.1: U1.A29@2225.56,30.73 2321.87,-65.58 ccw(c2335.02,-52.44) 2335.02,-71.02 2400.56,-71.02 cw(c2400.56,-94.77) 2408.12,-72.26 cw(c2400.56,-94.77) 2417.36,-77.98 ccw(c2431.93,-63.4) 2431.93,-84.02 2472.07,-84.02 cw(c2472.07,-89.55) 2477.6,-89.55 2477.6,-96.06 R53.2@2482.85,-106.51
NetR56_2: R56.2 R108.2 U3.H5 | length 665.2
  Top Layer w4.1: R56.2@2480.85,-146.47 2480.85,-162.29 ccw(c2490.53,-162.29) 2490.53,-171.97 v1(2520.21,-171.97)
  Top Layer w5.6: R108.2@2146.71,-147.63 2148.31,-149.23 2148.31,-162.12 2151.96,-165.77 2174.56,-165.77 v1(2175.19,-165.13)
  Signal L2 w5.6: v1@2172.2,-165.13 v1(2175.19,-165.13) 2200.86,-165.13 cw(c2200.86,-179.59) 2215.33,-179.59 2215.33,-246.17 ccw(c2253.06,-246.17) 2253.06,-283.9 2482.59,-283.9 ccw(c2482.59,-246.14) 2520.35,-246.14 v1@2520.35,-171.97
  Bottom Layer w4.1: v1(2175.19,-165.13) U3.H5@2195.64,-165.13
NetR57_2: R57.2 U17.17 | length 63.4
  Top Layer w15: v2(991.95,251.43) U17.17@991.95,279.73
  Bottom Layer w7: v2(991.95,251.43) 991.95,277.25 997.45,282.75 R57.2@998.95,282.75
NetR68_2: R68.2 U1.B37 | length 1569
  Top Layer w4: v3@2070.35,-47.22 U1.B37@2125.34,-47.22
  Signal L1 w4: v5(1384.66,-127.33) 1991.33,-127.33 v3(2070.35,-48.31)
  Signal L2 w4: v2(1052.77,209.74) 1031.86,209.74 1025.87,215.73 1025.87,259.5 1035.11,268.74 1181.61,268.74 1198.94,251.41 1198.94,-82.7 1243.56,-127.33 v5(1384.66,-127.33)
NetR69_2: R69.2 U17.19 | length 91.8
  Top Layer w7: v2@1062.69,251.43 v2(1062.81,251.43) U17.19@1062.81,279.73
  Top Layer w15: v2@1062.75,251.43 U17.19@1062.75,279.73
  Bottom Layer w7: R69.2@1055.81,282.76 1057.31,282.76 1062.81,277.26 v2(1062.81,251.43)
NetR70_2: R70.2 U17.20 | length 91.5
  Top Layer w7: v2@1098.12,251.43 v2(1098.25,251.43) U17.20@1098.25,279.73
  Top Layer w15: v2(1098.25,251.43) U17.20@1098.25,279.73
  Bottom Layer w7: R70.2@1091.58,282.75 1092.75,282.75 1098.25,277.25 v2(1098.25,251.43)
NetR73_1: R73.1 U1.1U16
  other v1: 1906.8,362.02
NetR76_1: R76.1 U2.11 | length 27
  Top Layer w6: v1(2554.54,-297.05) 2567.31,-297.05 cw(c2567.31,-315.1) R76.1@2580.07,-302.34
NetR77_1: R77.1 U2.4 | length 37.5
  Bottom Layer w6: U2.4@2529.88,-379.89 2530.54,-379.23 2565.83,-379.23 v1(2566.7,-378.36)
NetR80_2: R80.2 U17.21 | length 90.1
  Top Layer w7: v2@1133.55,251.43 v2(1133.68,251.43) U17.21@1133.68,279.73
  Top Layer w15: v2(1133.68,251.43) U17.21@1133.68,279.73
  Bottom Layer w7: R80.2@1128.68,282.76 1133.68,277.76 v2(1133.68,251.43)
NetR81_2: R81.2 U17.22 | length 63.7
  Top Layer w15: U17.22@1169.11,279.73 1171.45,277.38 1171.45,252.22 1172.05,251.63 v2@1172.05,251.43
  Bottom Layer w7: v2(1171.05,251.43) 1171.05,277.26 1176.55,282.76 R81.2@1177.11,282.76
NetR94_2: R94.2 X5.1 | length 143.3
  Bottom Layer w7: X5.1@1035.06,678.69 1039,678.69 1078.36,639.34 R94.2@1078.36,559.18 ; R94.2@1087.06,565.73 R94.2@1090.62,565.73
NetR102_1: R102.1 U12.A8 | length 79.6
  Top Layer w4.1: v1(2937.36,686.53) 2947.37,676.51 ; 2947.38,676.5 cw(c2934.2,663.34) 2952.83,663.34 U12.A8@2952.82,612.53
NetR103_1: R103.1 U12.A5 | length 92.5
  Top Layer w4.1: U12.A5@2858.34,612.53 2858.34,652.3 cw(c2876.96,652.3) 2863.79,665.46 v1(2884.86,686.53)
  Bottom Layer w7: R103.1@2884.86,685.03 2887.36,687.53 R103.1@2887.36,692.32
NetR119_1: R119.1 U1.1U7 | length 2445.1
  Top Layer w12: v3(648.74,-241.57) R119.1@657.42,-241.57
  Signal L1 w7: v3(648.74,-241.57) v5(667.95,-241.57)
  Signal L2 w5: v5@667.4,-241.57 667.4,674.47 cw(c697.09,674.47) 697.09,704.16 1891.61,704.16 cw(c1891.61,664.8) 1919.45,692.63 2063.46,548.62 ; 2063.47,548.61 cw(c2048.48,533.65) 2069.66,533.65 v1(2069.66,524.87)
NetR120_1: R120.1 U1.AP12 | length 2508.7
  Top Layer w4.1: v3(1912.87,651.03) 1958.88,651.03 1958.94,651.03 cw(c1958.93,629.58) 1974.12,644.72 2017.41,601.43 2023.25,595.6 2029.09,589.76 ccw(c2034.57,595.24) 2035.15,587.51 U1.AP12@2047.39,587.51
  Top Layer w12: v3(648.74,-213.99) R120.1@657.42,-213.99
  Signal L1 w4.1: v3(1912.87,651.03) 1953.72,651.03 1960.62,644.13 v5(1960.62,617.62)
  Signal L1 w7: v3@649.31,-213.99 v5@677.34,-213.99
  Signal L2 w5: v5(680.34,-213.99) 680.34,642.17 680.29,642.22 680.29,670.04 cw(c702.16,670.04) 702.16,691.91 1861.77,691.91 cw(c1861.77,673.21) 1880.47,673.21 1880.47,636.01 ccw(c1898.86,636.01) 1883.85,625.38 ccw(c1898.86,636.01) 1888.23,621 ccw(c1898.86,636.01) 1898.86,617.62 v5(1960.62,617.62)
NetR121_1: R121.1 U1.1V6 | length 2371.6
  Top Layer w12: v3(653.74,-186.79) R121.1@659.63,-186.79
  Signal L1 w7: v3(653.74,-186.79) v5(653.74,-164.49) v5@653.74,-163.78
  Signal L2 w5: v5(653.74,-164.49) 653.74,677.78 cw(c692.12,677.78) 692.12,716.16 1898.86,716.16 cw(c1898.86,678.24) 1925.7,705.02 v1(2069.66,561.06)
NetR123_1: R123.1 U1.1T6 | length 2620.3
  Top Layer w7: v3@652.43,-334.58 v3(653.74,-334.58) R123.1@660.6,-334.58
  Top Layer w12: v3(653.74,-334.58) R123.1@659.63,-334.58
  Signal L1 w7: v5(641.16,-257.82) 641.16,-322 ccw(c653.74,-322) v3(653.74,-334.58)
  Signal L2 w5: v5(641.16,-257.82) 641.16,681.42 cw(c687.37,681.42) 687.37,727.62 1905.28,727.62 1905.33,727.62 cw(c1905.31,689.26) 1932.44,716.38 ; 1932.47,716.35 2099.45,549.37 ; 2099.47,549.35 cw(c2084,533.92) 2105.85,533.92 v1(2105.85,524.87)
NetR124_1: R124.1 U1.1L2 | length 336.2
  Top Layer w4: v3(2240.18,703.79) 2323.09,703.79 2326.59,707.29 R124.1@2326.59,734.38
  Signal L1 w5: v3(2240.18,703.79) 2258.6,703.79 cw(c2258.6,693.61) 2268.78,693.61 v1(2268.78,506.78)
OSC_32KHZ: R96.2 X5.3 | length 59.6
  Bottom Layer w7: X5.3@1121.68,611.76 1136.24,597.2 R96.2@1136.24,558.23
OTG0_VBUSDET: C141.2 R16.2 R17.1 U1.T38 | length 172.9
  Top Layer w6: R16.2@1877.36,-15.45 R17.1@1877.36,18.03 C141.2@1918.18,18.03 1923.18,23.03 1927.41,23.03 1944.17,39.79 1944.17,83.41 U1.T38@1958.31,97.55
PDM_CLK0_M0: U1.1A14 U7.19 | length 1739.5
  PWR-2 w4.1: v1(1673.36,-189.43) 1673.4,-189.47 1729.49,-189.47 1800.25,-118.71 2126.06,-118.71 2161.27,-83.5 2386.62,-83.5 2487.4,-184.27 v1(2584.36,-184.27)
  Bottom Layer w4.1: v1(2232.52,108.68) 2260.99,108.68 cw(c2260.99,93.68) 2271.59,104.3 2292.05,83.84 2292.09,83.8 ccw(c2304.39,96.25) 2304.42,78.74 2331.15,78.74 2411.2,78.74 2423.41,78.73 2423.53,78.73 cw(c2423.44,-37.47) 2431.5,78.45 ccw(c2432.36,90.37) 2431.57,78.44 ccw(c2432.36,90.37) 2432.18,78.42 2454.66,78.07 ccw(c2454.86,90.03) 2454.86,78.07 2604.66,78.07 cw(c2604.66,65.29) 2617.44,65.29 2617.44,-176.46 cw(c2609.63,-176.46) 2609.63,-184.27 v1(2584.36,-184.27)
  Bottom Layer w6: U7.19@1647.73,-145.21 1648.32,-145.8 1648.32,-173.76 1663.99,-189.43 v1(1673.36,-189.43)
PMIC_32KOUT_WIFI: R2.1 R9.2 R10.2 | length 667.5
  Top Layer w4: R10.2@1647.19,430.77 R10.2@1647.52,430.77
  Top Layer w6: v3(1616.46,400.03) R10.2@1647.19,430.77
  Signal L1 w4: v8(1399.49,565.32) 1399.49,454.71 1454.73,399.47 v3@1616.46,399.47
  Signal L2 w4: v4(1177.11,572.73) 1177.11,579.94 cw(c1191.36,579.94) 1191.36,594.19 1385.87,594.19 cw(c1385.87,580.57) 1399.49,580.57 v8(1399.49,565.32)
  Bottom Layer w15: R2.1@1177.11,560.23 v4(1177.11,572.73)
PMIC_INT: U1.1R19 U7.7 | length 399.2
  PWR-1 w5.6: v1(1753.95,80.6) 1753.95,121.69 1801.52,169.26 1842.01,169.26 1849.83,177.09 1849.83,255.93 1865.82,271.92 1888.33,271.92 v1(1888.71,271.54)
  Bottom Layer w5: U7.7@1686.67,18.13 1727.58,18.13 1742.47,33.02 1742.47,69.98 1753.1,80.6 v1(1753.95,80.6)
PMIC_SLEEP: R13.2 U1.1P19 U7.49 | length 1280.7
  Top Layer w4: v1(1397.31,72.71) 1397.31,144.3 v3@1399.49,146.47
  Signal L1 w4: v3(1397.49,146.47) 1397.49,128.77 ccw(c1408.73,128.77) 1408.73,117.53 1887.97,117.53 ccw(c1887.97,136.36) 1906.8,136.36 v1(1906.8,253.44)
  Signal L2 w5.6: v1(1906.8,253.44) 1906.85,253.5 1906.85,302.14 v4(1906.9,302.19)
  Bottom Layer w7: R13.2@1617.36,613.53 1646.67,613.53 cw(c1646.67,584.1) 1676.09,584.1 1676.09,515.09 ccw(c1689.45,515.09) 1689.45,501.73 1755.27,501.73 cw(c1755.27,474.81) 1774.26,493.89 cw(c1755.27,474.81) 1774.3,493.85 1875.99,392.16 cw(c1849.86,366.03) 1886.81,366.03 1886.81,336.49 ccw(c1921.11,336.49) 1896.86,312.24 v4(1906.9,302.19)
PWRON_KEY: D2.2 R31.2 SW2.2 | length 39.2
  Bottom Layer w7: R31.2@3164.86,170.79 v1(3192.13,170.79) D2.2@3204.08,170.79
RESET_KEY: D1.2 R37.2 SW1.2 | length 90.6
  Top Layer w10: SW1.2@3186.17,217.6 3192.13,223.56 v1(3192.13,266.54)
  Bottom Layer w10: R37.2@3164.86,266.54 v1(3192.13,266.54) D1.2@3204.08,266.54
RSTN_LT: C286.2 Q1.3 R110.2 U4.20 | length 2670.3
  Top Layer w4: v3(2206.77,771.52) 2206.77,734.97 2215.49,726.24 Q1.3@2262.9,726.24
  Top Layer w7: C286.2@683.12,-95.66 C286.2@683.24,-95.78 ; R110.2@683.25,-137.91 C286.2@683.24,-95.78 ; C286.2@683.24,-95.66 C286.2@683.24,-95.78 ; U4.20@729.93,-96.91 v3(706.5,-96.91) 684.37,-96.91 C286.2@683.24,-95.78
  Signal L1 w4.1: v3(706.5,-96.91) 664.05,-96.91 cw(c664.05,-74.02) 641.16,-74.02 641.16,248.27 cw(c664.95,248.27) 664.95,272.06 789.89,272.06 ccw(c789.89,287.11) 804.94,287.11 804.94,688.37 cw(c832.73,688.37) 832.73,716.16 1212.64,716.16 ccw(c1212.64,726.97) 1223.45,726.97 1223.45,775.4 cw(c1233.92,775.4) 1233.92,785.86 1491.78,785.86 ; 1491.83,785.86 cw(c1491.81,757.77) 1511.67,777.63 1528.6,760.71 ; 1528.63,760.68 ccw(c1544.7,776.75) 1544.7,754.02 ; 1544.73,754.02 2189.27,754.02 v3(2206.77,771.52)
RX1_N: C52.1 J9.B11 | length 127.4
  Bottom Layer w4.1: J9.B11@460.4,82.88 568.59,82.88 572.43,79.03 572.91,79.03 579.86,72.08 C52.1@579.86,68.58
RX1_P: C53.1 J9.B10 | length 127.9
  Bottom Layer w4.1: J9.B10@488.73,102.55 493.29,102.55 502.87,92.98 516.76,92.98 518.81,92.98 ccw(c518.81,98.03) 523.86,98.03 523.86,104.42 cw(c528.91,104.42) 533.96,104.42 533.96,98.03 ccw(c539.01,98.03) 539.01,92.98 547.03,92.98 567.9,92.98 572.91,97.98 572.91,101.5 C53.1@579.86,108.45
RX2_N: C55.1 J9.A11 | length 63.3
  Top Layer w4.1: J9.A11@527.36,260.04 531.21,256.18 540.48,256.18 541.46,255.2 569.29,255.2 573.27,259.18 573.64,259.18 580.59,266.13 C55.1@580.59,269.63
RX2_P: C54.1 J9.A10 | length 63.4
  Top Layer w4.1: J9.A10@527.36,240.36 531.21,244.21 540.56,244.21 541.46,245.1 568.97,245.1 573.3,240.77 573.64,240.77 580.59,233.82 C54.1@580.59,230.32
RX_HPD: TP14.1 U4.23 | length 748.2
  Top Layer w7: v3@701.78,-144.32 701.86,-144.24 729.85,-144.24 U4.23@729.93,-144.16 ; TP14.1@1180.2,-416.82 1180.44,-416.82 v3(1180.44,-395.19)
  Signal L1 w5: v3(700.96,-144.32) 719.03,-144.32 cw(c719.03,-151.7) 726.4,-151.7 726.4,-339.75 ccw(c748.3,-339.75) 748.3,-361.64 1097.43,-361.64 1130.98,-395.19 v3(1180.44,-395.19)